# Altium PCB A313_6.PcbDoc (part 1 of 3)
Units mm, origin at the board's own origin, x right, y up, seen from the top; angles counter-clockwise.
Board outline 230.01 x 157.01 mm, 2 copper layers (Top Layer, Bottom Layer); 234 components, 195 nets, 1068 pads, 566 vias.
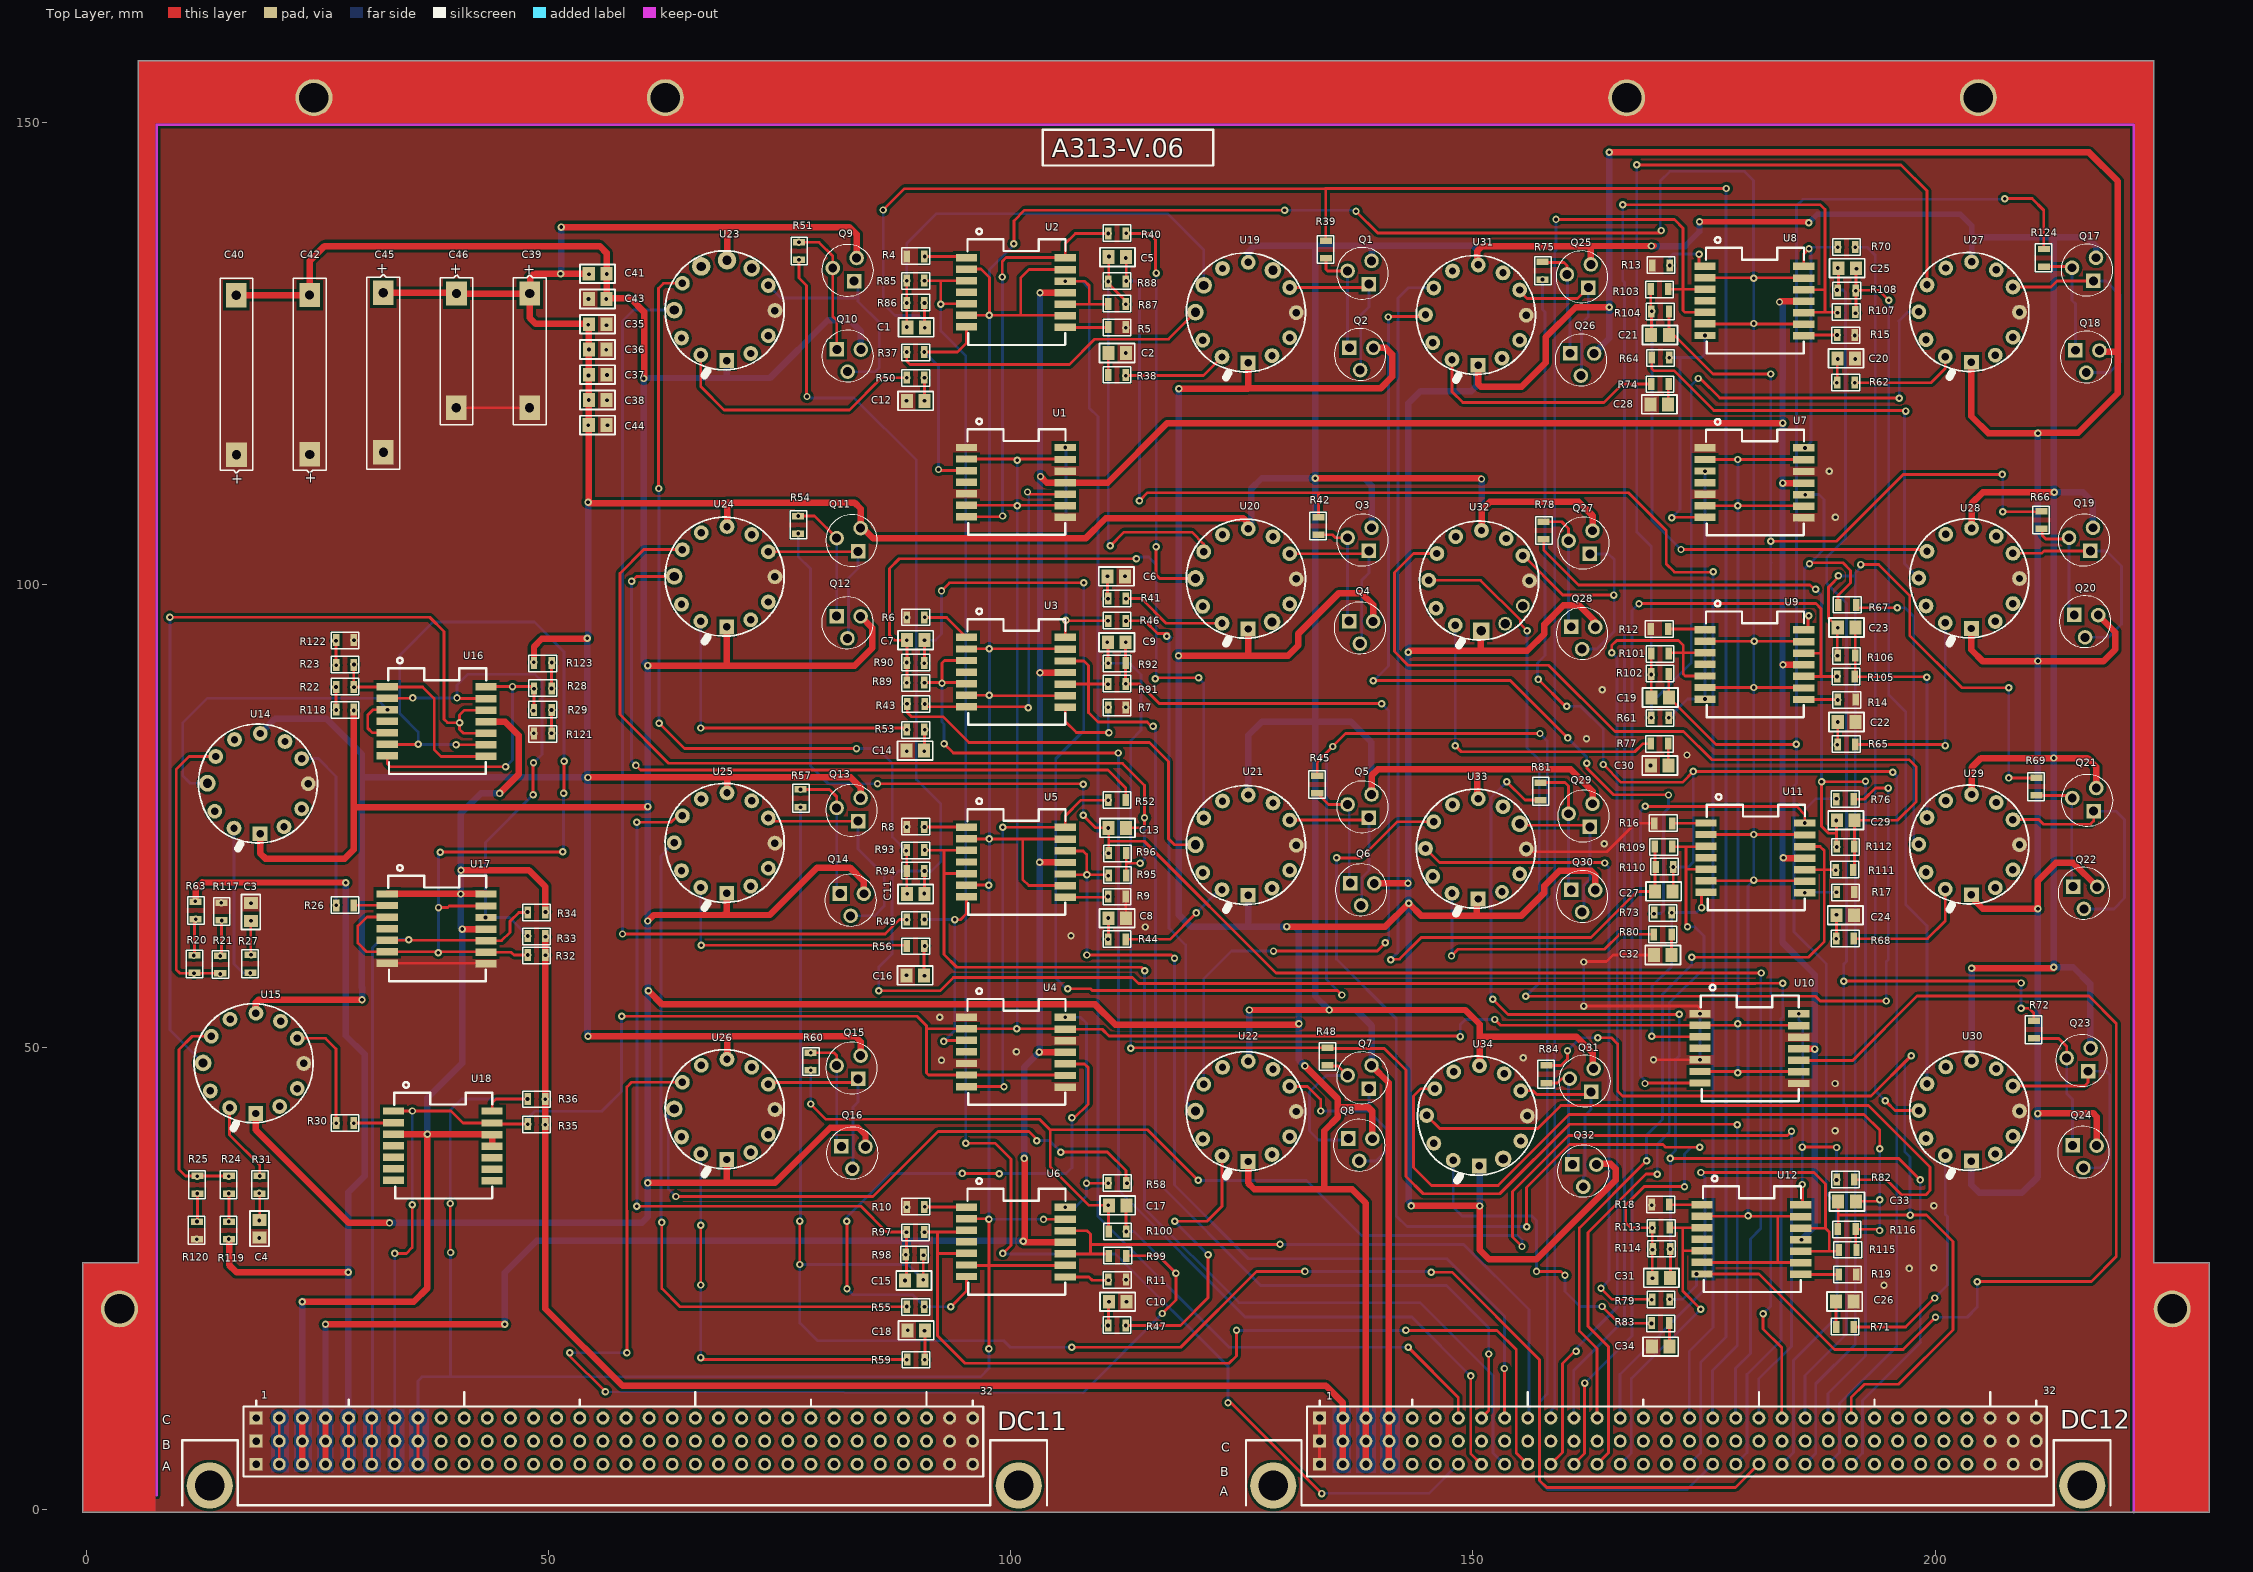
[diagram p0: Top Layer view]
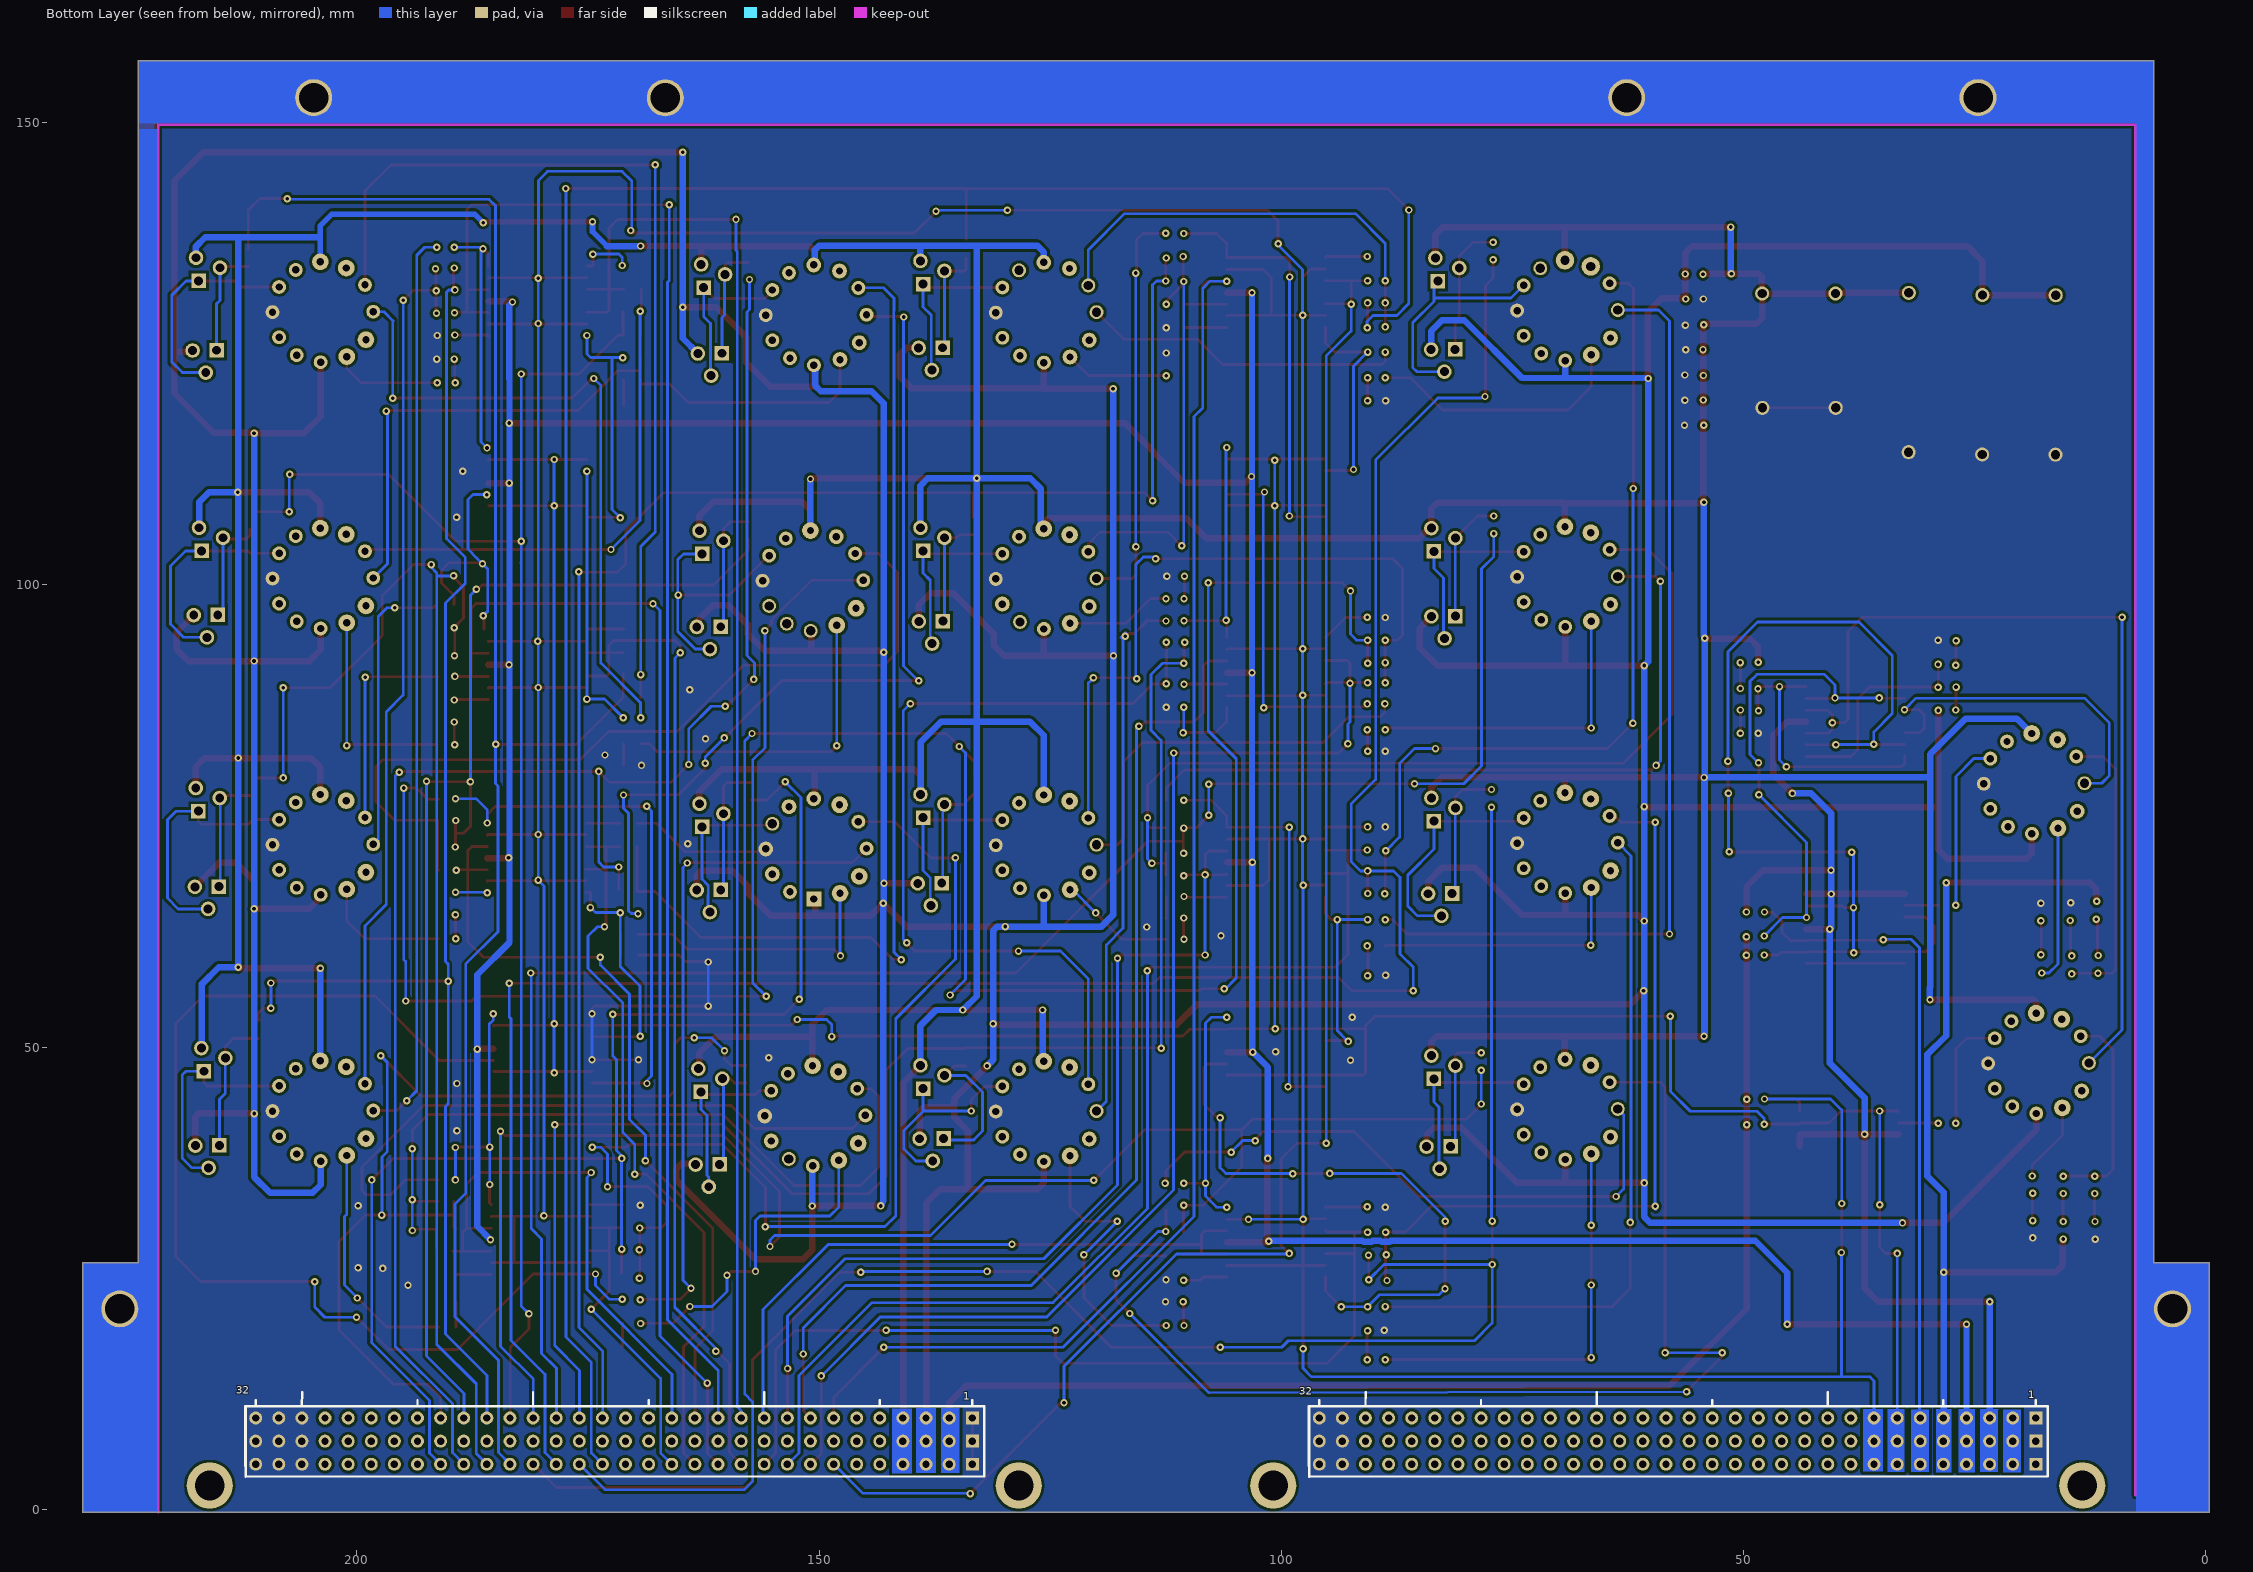
[diagram p1: Bottom Layer view, seen from below]

## Layer stack, top to bottom
Top Solder: solder mask 0.0102, Solder Resist, Dk 3.5
Top Layer: signal copper 0.0356
Dielectric1: dielectric 0.32, FR-4, Dk 4.8
Bottom Layer: signal copper 0.0356
Bottom Solder: solder mask 0.0102, Solder Resist, Dk 3.5

## Board outline
-0.37,-0.304 -0.37,26.696 cw(c-0.363,26.696) -0.363,26.703 5.63,26.703 5.63,156.696 cw(c5.637,156.696) 5.637,156.703 223.637,156.703 cw(c223.637,156.696) 223.644,156.696 223.644,26.703 229.637,26.703 cw(c229.637,26.696) 229.644,26.696 229.644,-0.304 cw(c229.637,-0.304) 229.637,-0.311 -0.363,-0.311 cw(c-0.363,-0.304)

## Design rules (kind name [scope] priority, off if disabled: settings)
Clearance [All] p1: gap=0.3 ignorepadtopadclearanceinfootprint=FALSE except(0: Arc-Hole Track-Hole SMDPad-Hole THPad-Hole Via-Hole Fill-Hole Poly-Hole Region-Hole Text-Hole)
HoleSize [All] p1: absolutevalues=TRUE maxlimit=10 minlimit=0.025 maxpercent=80.000 minpercent=20.000
MinimumSolderMaskSliver [All] p1: minsoldermaskwidth=0.1
PolygonConnect [All] p1: connectstyle=Direct reliefconductorwidth=0.254 reliefentries=4 polygonreliefangle="90 Angle" airgapwidth=0.254
RoutingVias [All] p1: holewidth=0.4 width=0.8 viastyle="Through Hole" minholewidth=0.4 minwidth=0.8 maxholewidth=0.4 maxwidth=0.8
SilkToSilkClearance [All] p1: silktosilkclearance=0.2
SilkToSolderMaskClearance [IsPad] p1: minsilkscreentomaskgap=0 clearancetoexposedcopper=TRUE
SolderMaskExpansion [All] p1: expansion=0.102
Width [All] p1: maxlimit=1 minlimit=0.3 preferedwidth=0.3 minimp=50.000000 maximp=50.000000 favimp=50.000000
26 further rules are at their usual default settings.

## Components (designator, comment, footprint, x,y, rotation, side; value= is the part's Value field where it differs from the comment)
C1 "CAP NP" 0805 89.775,127.85 r0 top
C2 "CAP NP" 0805 111.525,125.075 r180 top
C3 "CAP NP" 0805 17.825,64.625 r90 top
C4 "CAP NP" 0805 18.768,30.374 r270 top
C5 "CAP NP" 0805 111.55,135.45 r0 top
C6 "CAP NP" 0805 111.425,100.925 r180 top
C7 "CAP NP" 0805 89.725,94.025 r0 top
C8 "CAP NP" 0805 111.525,63.95 r180 top
C9 "CAP NP" 0805 111.475,93.8 r180 top
C10 "CAP NP" 0805 111.575,22.475 r180 top
C11 "CAP NP" 0805 89.725,66.575 r0 top
C12 "CAP NP" 0805 89.725,119.9 r0 top
C13 "CAP NP" 0805 111.55,73.725 r180 top
C14 "CAP NP" 0805 89.675,82.075 r0 top
C15 "CAP NP" 0805 89.525,24.775 r0 top
C16 "CAP NP" 0805 89.675,57.775 r0 top
C17 "CAP NP" 0805 111.575,32.9 r180 top
C18 "CAP NP" 0805 89.775,19.375 r0 top
C19 "CAP NP" 0805 170.25,87.825 r0 top
C20 "CAP NP" 0805 190.35,124.5 r180 top
C21 "CAP NP" 0805 170.225,127.025 r0 top
C22 "CAP NP" 0805 190.4,85.175 r180 top
C23 "CAP NP" 0805 190.4,95.4 r180 top
C24 "CAP NP" 0805 190.275,64.275 r180 top
C25 "CAP NP" 0805 190.475,134.25 r180 top
C26 "CAP NP" 0805 190.2,22.5 r180 top
C27 "CAP NP" 0805 170.625,66.85 r0 top
C28 "CAP NP" 0805 170.15,119.525 r0 top
C29 "CAP NP" 0805 190.325,74.55 r180 top
C30 "CAP NP" 0805 170.2,80.475 r0 top
C31 "CAP NP" 0805 170.375,25.05 r0 top
C32 "CAP NP" 0805 170.525,59.975 r0 top
C33 "CAP NP" 0805 190.45,33.3 r180 top
C34 "CAP NP" 0805 170.3,17.625 r0 top
C35 "3300pf" 0805 55.327,128.192 r180 top
C36 "3300pf" 0805 55.327,125.462 r180 top
C37 "3300pf" 0805 55.327,122.733 r180 top
C38 "3300pf" 0805 55.327,120.004 r180 top
C39 "4,7uf" c4,7uf 47.975,133.525 r270 top
C40 "22uf" c22uf 16.3,112 r90 top
C41 "3300pf" 0805 55.322,133.65 r0 top
C42 "22uf" c22uf 24.232,112.025 r90 top
C43 "3300pf" 0805 55.327,130.921 r180 top
C44 "3300pf" 0805 55.322,117.275 r0 top
C45 "22uf" c22uf 32.11,133.675 r270 top
C46 "4,7uf" c4,7uf 40.043,133.525 r270 top
DC11 "DC96c" DC96 3.526,3.671 r0 top locked
DC12 "DC96c" DC96 118.551,3.671 r0 top locked
Q1 "2T312B" TZT203G 137.8,133.95 r0 top
Q2 "2T203B" 2T203B 137.7,124.8 r180 top
Q3 "2T312B" TZT203G 137.8,105.1 r0 top
Q4 "2T203B" 2T203B 137.675,95.225 r180 top
Q5 "2T312B" TZT203G 137.8,76.25 r0 top
Q6 "2T203B" 2T203B 137.8,66.9 r180 top
Q7 "2T312B" TZT203G 137.8,46.95 r0 top
Q8 "2T203B" 2T203B 137.6,39.275 r180 top
Q9 "2T312B" TZT203G 82.119,134.271 r0 top
Q10 "2T203B" 2T203B 82.275,124.625 r180 top
Q11 "2T312B" TZT203G 82.55,105.05 r0 top
Q12 "2T203B" 2T203B 82.25,95.775 r180 top
Q13 "2T312B" TZT203G 82.55,75.875 r0 top
Q14 "2T203B" 2T203B 82.6,65.775 r180 top
Q15 "2T312B" TZT203G 82.55,48 r0 top
Q16 "2T203B" 2T203B 82.775,38.425 r180 top
Q17 "2T312B" TZT203G 216.15,134.3 r0 top
Q18 "2T203B" 2T203B 216.225,124.525 r180 top
Q19 "2T312B" TZT203G 215.825,105.1 r0 top
Q20 "2T203B" 2T203B 216.1,95.9 r180 top
Q21 "2T312B" TZT203G 216.175,76.95 r0 top
Q22 "2T203B" 2T203B 215.975,66.525 r180 top
Q23 "2T312B" TZT203G 215.575,48.825 r0 top
Q24 "2T203B" 2T203B 215.925,38.525 r180 top
Q25 "2T312B" TZT203G 161.525,133.575 r0 top
Q26 "2T203B" 2T203B 161.575,124.2 r180 top
Q27 "2T312B" TZT203G 161.7,104.775 r0 top
Q28 "2T203B" 2T203B 161.7,94.625 r180 top
Q29 "2T312B" TZT203G 161.7,75.25 r0 top
Q30 "2T203B" 2T203B 161.7,66.175 r180 top
Q31 "2T312B" TZT203G 161.825,46.6 r0 top
Q32 "2T203B" 2T203B 161.825,36.475 r180 top
R4 "10k/1%" R0805 90.398,135.425 r90 top
R5 "10k/1%" R0805 110.827,127.975 r270 top
R6 "10k/1%" R0805 90.398,96.375 r90 top
R7 "10k/1%" R0805 110.827,86.85 r270 top
R8 "10k/1%" R0805 90.398,73.725 r90 top
R9 "10k/1%" R0805 110.827,66.4 r270 top
R10 "10k/1%" R0805 90.398,32.625 r90 top
R11 "10k/1%" R0805 110.85,24.95 r270 top
R12 "10k/1%" R0805 170.825,95.125 r90 top
R13 "10k/1%" R0805 171,134.45 r90 top
R14 "10k/1%" R0805 189.75,87.675 r270 top
R15 "10k/1%" R0805 189.65,127.125 r270 top
R16 "10k/1%" R0805 171.25,74.125 r90 top
R17 "10k/1%" R0805 189.6,66.875 r270 top
R18 "10k/1%" R0805 170.975,32.875 r90 top
R19 "10k/1%" R0805 189.825,25.525 r270 top
R20 "2,61k/1%" R0805 11.625,58.325 r0 top
R21 "301r/1%" R0805 14.425,58.275 r0 top
R22 "10,5k/1%" R0805 28.673,88.875 r90 top
R23 "301r/1%" R0805 28.673,91.25 r90 top
R24 "2,050Mom/1%" R0805 15.545,35.799 r180 top
R25 "301r/1%" R0805 12.143,35.799 r180 top
R26 "4,7k" R0805 28.673,65.25 r90 top
R27 "56r" R0805 17.875,59.7 r180 top
R28 "10,5k/1%" R0805 50.073,88.725 r90 top
R29 "301r/1%" R0805 50.073,86.4 r90 top
R30 "4,7k" R0805 28.673,41.7 r90 top
R31 "56r" R0805 18.693,34.451 r0 top
R32 "10k" R0805 48.05,60.05 r270 top
R33 "10k" R0805 48.05,62.125 r270 top
R34 "1,8k" R0805 48.05,64.675 r270 top
R35 "10k" R0805 48.05,41.775 r270 top
R36 "10k" R0805 48.05,44.5 r270 top
R37 "4,7k/5%" R0805 89.05,125.275 r270 top
R38 "56r" R0805 112.175,122.6 r90 top
R39 "180r" R0805 134.2,136.95 r180 top
R40 "4,7k/5%" R0805 112.175,137.925 r90 top
R41 "56r" R0805 112.175,98.425 r90 top
R42 "180r" R0805 133.375,107.05 r180 top
R43 "4,7k/5%" R0805 89.1,87.225 r270 top
R44 "56r" R0805 112.175,61.575 r90 top
R45 "180r" R0805 133.25,79.1 r180 top
R46 "4,7k/5%" R0805 112.175,96.025 r90 top
R47 "56r" R0805 112.175,19.825 r90 top
R48 "180r" R0805 134.375,49.675 r180 top
R49 "4,7k/5%" R0805 89.05,63.9 r270 top
R50 "56r" R0805 89.05,122.5 r270 top
R51 "180r" R0805 77.007,135.426 r0 top
R52 "4,7k/5%" R0805 112.175,76.625 r90 top
R53 "56r" R0805 89.05,84.45 r270 top
R54 "180r" R0805 76.925,105.825 r0 top
R55 "4,7k/5%" R0805 89.05,22.025 r270 top
R56 "56r" R0805 89.05,61.05 r270 top
R57 "180r" R0805 77.175,76.25 r0 top
R58 "4,7k/5%" R0805 112.2,35.2 r90 top
R59 "56r" R0805 89.075,16.325 r270 top
R60 "180r" R0805 78.275,47.775 r0 top
R61 "4,7k/5%" R0805 169.55,85.725 r270 top
R62 "56r" R0805 191,121.775 r90 top
R63 "0r" R0805 11.75,64.125 r0 top
R64 "4,7k/5%" R0805 169.6,124.675 r270 top
R65 "56r" R0805 191.05,82.65 r90 top
R66 "180r" R0805 211.575,107.7 r180 top
R67 "4,7k/5%" R0805 191.15,97.725 r90 top
R68 "56r" R0805 190.925,61.65 r90 top
R69 "180r" R0805 211.025,78.85 r180 top
R70 "4,7k/5%" R0805 191.075,136.425 r90 top
R71 "56r" R0805 190.9,19.65 r90 top
R72 "180r" R0805 210.75,52.575 r180 top
R73 "4,7k/5%" R0805 169.875,64.65 r270 top
R74 "56r" R0805 169.55,121.825 r270 top
R75 "180r" R0805 157.425,133.3 r0 top
R76 "4,7k/5%" R0805 190.925,76.725 r90 top
R77 "56r" R0805 169.5,82.925 r270 top
R78 "180r" R0805 157.55,105.2 r0 top
R79 "4,7k/5%" R0805 169.65,22.825 r270 top
R80 "56r" R0805 169.85,62.3 r270 top
R81 "180r" R0805 157.2,77 r0 top
R82 "4,7k/5%" R0805 190.95,35.575 r90 top
R83 "56r" R0805 169.625,20.25 r270 top
R84 "180r" R0805 158.025,47.75 r180 top
R85 "10k" R0805 89.05,133 r270 top
R86 "10k" R0805 90.398,130.4 r90 top
R87 "10k" R0805 112.175,130.3 r90 top
R88 "10k/1%" R0805 112.175,132.725 r90 top
R89 "10k" R0805 89.05,89.525 r270 top
R90 "10k" R0805 90.398,91.475 r90 top
R91 "10k" R0805 112.175,89.2 r90 top
R92 "10k" R0805 110.827,91.625 r270 top
R93 "10k" R0805 89.05,71.4 r270 top
R94 "10k" R0805 90.398,68.975 r90 top
R95 "10k" R0805 112.225,68.5 r90 top
R96 "10k" R0805 110.875,71.1 r270 top
R97 "10k" R0805 89.025,30.1 r270 top
R98 "10k" R0805 90.275,27.475 r90 top
R99 "10k" R0805 112.25,27.35 r90 top
R100 "10k" R0805 110.875,30.175 r270 top
R101 "10k" R0805 169.55,92.65 r270 top
R102 "10k" R0805 170.9,90.275 r90 top
R103 "10k" R0805 169.5,132.075 r270 top
R104 "10k" R0805 170.925,129.45 r90 top
R105 "10k" R0805 191.025,89.975 r90 top
R106 "10k" R0805 189.725,92.45 r270 top
R107 "1OK" R0805 191.05,129.4 r90 top
R108 "10k" R0805 189.75,131.95 r270 top
R109 "10k" R0805 169.95,71.775 r270 top
R110 "10k" R0805 171.375,69.4 r90 top
R111 "10k" R0805 190.875,69.075 r90 top
R112 "1OK" R0805 189.625,71.8 r270 top
R113 "10k" R0805 169.675,30.575 r270 top
R114 "10k" R0805 171.075,28.075 r90 top
R115 "10k" R0805 191.201,27.968 r90 top
R116 "10k" R0805 189.75,30.425 r270 top
R117 "0r" R0805 14.55,64 r0 top
R118 "0r" R0805 27.325,86.6 r270 top
R119 "0r" R0805 15.545,30.874 r180 top
R120 "0r" R0805 12.093,30.874 r180 top
R121 "0r" R0805 48.725,84.025 r270 top
R122 "0r" R0805 27.325,94.125 r270 top
R123 "0r" R0805 48.725,91.65 r270 top
R124 "180r" R0805 211.825,136.05 r180 top (schematic designator Rr63)
U1 "168KT2b_4" 168KT2B-1#1 95.325,116.685 r0 top
U2 "168KT2b_4" 168KT2B-1#1 95.325,137.225 r0 top
U3 "168KT2b_4" 168KT2B-1#1 95.325,96.145 r0 top
U4 "168KT2b_4" 168KT2B-1#1 95.325,55.065 r0 top
U5 "168KT2b_4" 168KT2B-1#1 95.325,75.605 r0 top
U6 "168KT2b_4" 168KT2B-1#1 95.325,34.525 r0 top
U7 "168KT2b_4" 168KT2B-1#1 175.199,116.638 r0 top
U8 "168KT2b_4" 168KT2B-1#1 175.199,136.3 r0 top
U9 "168KT2b_4" 168KT2B-1#1 175.199,96.976 r0 top
U10 "168KT2b_4" 168KT2B-1#1 174.65,55.45 r0 top
U11 "168KT2b_4" 168KT2B-1#1 175.3,76.075 r0 top
U12 "168KT2b_4" 168KT2B-1#2 174.875,34.8 r0 top
U14 "140YD1B" 140YD#1 18.825,78.775 r0 top
U15 "140YD1B" 140YD#1 18.35,48.525 r0 top
U16 "168KT2V" 168KT2B-1#1 32.675,90.825 r0 top
U17 "168KT2V" 168KT2B-1#1 32.675,68.4 r0 top
U18 "168KT2V" 168KT2B-1#1 33.35,44.925 r0 top
U19 "140YD1B" 140YD#2 125.675,129.725 r0 top
U20 "140YD1B" 140YD#3 125.675,100.925 r0 top
U21 "140YD1B" 140YD#1 125.675,72.125 r0 top
U22 "140YD1B" 140YD#4 125.675,43.325 r0 top
U23 "140YD1B" 140YD#5 69.3,129.95 r0 top
U24 "140YD1B" 140YD#1 69.3,101.15 r0 top
U25 "140YD1B" 140YD#6 69.3,72.35 r0 top
U26 "140YD1B" 140YD#7 69.3,43.55 r0 top
U27 "140YD1B" 140YD#6 203.9,129.775 r0 top
U28 "140YD1B" 140YD#6 203.9,100.975 r0 top
U29 "140YD1B" 140YD#8 203.9,72.175 r0 top
U30 "140YD1B" 140YD#6 203.9,43.375 r0 top
U31 "140YD1B" 140YD#9 150.55,129.45 r0 top
U32 "140YD1B" 140YD#10 150.9,100.725 r0 top
U33 "140YD1B" 140YD#11 150.55,71.725 r0 top
U34 "140YD1B" 140YD#12 150.675,42.85 r0 top

## Footprints (in the part's own frame and the unit in brackets; to place one, negate y for a bottom-side part, rotate by r counter-clockwise, add the part's x,y. Pads: shape width x height; smd on the part's side, far side on the other; paste and mask are expansions set on the pad)
2T203B [mil]
  rect 62x62 hole 38 mask+5: 1(42.32,-33.46)
  round 62 hole 38 mask+7.87: 2(-3.85,61.72)
  round 62 hole 38 mask+5: 3(-60.04,-32.48)
  silkscreen extent -114,-115 106,105
140YD#1 [mm]
  rect 1.6x1.6 / inner rect 1.6x1.6 / far side round 1.499 hole 0.8 mask+0.2: 1(0,-5.69)
  round 1.6 / inner round 1.6 / far side round 1.499 hole 0.8: 2(2.59,-4.928) 3(4.495,-2.997) 4(5.207,-0.279) 5(4.495,2.438) 6(2.692,4.293) 9(-4.801,2.667)
  round 1.6 / inner round 1.6 / far side round 1.8 hole 0.8 mask+0.2: 7(0.025,5.156)
  round 1.6 / inner round 1.6 / far side round 1.8 hole 0.8: 8(-2.769,4.496) 12(-2.82,-5.08)
  round 1.8 / inner round 1.8 / far side round 1.499 hole 1: 10(-5.69,-0.229)
  round 1.6 hole 0.8: 11(-4.903,-3.251)
  silkscreen extent -6.66,-7.29 6.21,6.18
140YD#2 [mm]
  rect 1.6x1.6 / inner rect 1.6x1.6 / far side round 1.499 hole 0.8 mask+0.2: 1(0,-5.69)
  round 1.6 / inner round 1.6 / far side round 1.499 hole 0.8: 2(2.59,-4.928) 3(4.495,-2.997) 4(5.207,-0.279) 5(4.495,2.438)
  round 1.8 / inner round 1.8 / far side round 1.499 hole 1: 6(2.692,4.293) 9(-4.801,2.667) 10(-5.69,-0.229)
  round 1.6 hole 0.8 mask+0.2: 7(0.025,5.156)
  round 1.6 hole 0.8: 8(-2.769,4.496) 11(-4.903,-3.251) 12(-2.82,-5.08)
  silkscreen extent -6.66,-7.29 6.21,6.18
140YD#3 [mm]
  rect 1.6x1.6 / inner rect 1.6x1.6 / far side round 1.499 hole 0.8 mask+0.2: 1(0,-5.69)
  round 1.8 / inner round 1.8 / far side round 1.499 hole 1: 2(2.59,-4.928) 10(-5.69,-0.229)
  round 1.6 hole 0.8: 3(4.495,-2.997) 11(-4.903,-3.251)
  round 1.6 / inner round 1.6 / far side round 1.499 hole 0.8: 4(5.207,-0.279) 5(4.495,2.438) 6(2.692,4.293) 9(-4.801,2.667)
  round 1.6 / inner round 1.6 / far side round 1.8 hole 0.8 mask+0.2: 7(0.025,5.156)
  round 1.6 / inner round 1.6 / far side round 1.8 hole 0.8: 8(-2.769,4.496) 12(-2.82,-5.08)
  silkscreen extent -6.66,-7.29 6.21,6.18
140YD#4 [mm]
  rect 1.6x1.6 / inner rect 1.6x1.6 / far side round 1.499 hole 0.8 mask+0.15: 1(0,-5.69)
  round 1.6 / inner round 1.6 / far side round 1.499 hole 0.8: 2(2.59,-4.928) 3(4.495,-2.997) 4(5.207,-0.279) 5(4.495,2.438) 6(2.692,4.293) 9(-4.801,2.667)
  round 1.6 / inner round 1.6 / far side round 1.8 hole 0.8 mask+0.2: 7(0.025,5.156)
  round 1.6 / inner round 1.6 / far side round 1.8 hole 0.8: 8(-2.769,4.496) 12(-2.82,-5.08)
  round 1.8 / inner round 1.8 / far side round 1.499 hole 1: 10(-5.69,-0.229)
  round 1.6 hole 0.8: 11(-4.903,-3.251)
  silkscreen extent -6.66,-7.29 6.21,6.18
140YD#5 [mm]
  rect 1.6x1.6 / inner rect 1.6x1.6 / far side round 1.499 hole 0.8 mask+0.2: 1(0,-5.69)
  round 1.6 / inner round 1.6 / far side round 1.499 hole 0.8: 2(2.59,-4.928) 3(4.495,-2.997) 4(5.207,-0.279) 5(4.495,2.438) 9(-4.801,2.667)
  round 1.8 / inner round 1.8 / far side round 1.499 hole 1: 6(2.692,4.293) 10(-5.69,-0.229)
  round 2 hole 1 mask+0.2: 7(0.025,5.156)
  round 2 hole 1: 8(-2.769,4.496)
  round 1.6 hole 0.8: 11(-4.903,-3.251)
  round 1.6 / inner round 1.6 / far side round 1.8 hole 0.8: 12(-2.82,-5.08)
  silkscreen extent -6.66,-7.29 6.21,6.18
140YD#6 [mm]
  rect 1.6x1.6 / inner rect 1.6x1.6 / far side round 1.499 hole 0.8 mask+0.2: 1(0,-5.69)
  round 1.6 / inner round 1.6 / far side round 1.499 hole 0.8: 2(2.59,-4.928) 3(4.495,-2.997) 4(5.207,-0.279) 5(4.495,2.438) 6(2.692,4.293) 9(-4.801,2.667) 10(-5.69,-0.229)
  round 1.6 / inner round 1.6 / far side round 1.8 hole 0.8 mask+0.2: 7(0.025,5.156)
  round 1.6 / inner round 1.6 / far side round 1.8 hole 0.8: 8(-2.769,4.496) 11(-4.903,-3.251) 12(-2.82,-5.08)
  silkscreen extent -6.66,-7.29 6.21,6.18
140YD#7 [mm]
  rect 1.6x1.6 / inner rect 1.6x1.6 / far side round 1.499 hole 0.8 mask+0.2: 1(0,-5.69)
  round 1.6 / inner round 1.6 / far side round 1.499 hole 0.8: 2(2.59,-4.928) 3(4.495,-2.997) 4(5.207,-0.279) 5(4.495,2.438) 6(2.692,4.293) 9(-4.801,2.667)
  round 1.6 hole 0.8 mask+0.2: 7(0.025,5.156)
  round 1.6 / inner round 1.6 / far side round 1.8 hole 0.8: 8(-2.769,4.496) 12(-2.82,-5.08)
  round 1.8 / inner round 1.8 / far side round 1.499 hole 1: 10(-5.69,-0.229)
  round 1.6 hole 0.8: 11(-4.903,-3.251)
  silkscreen extent -6.66,-7.29 6.21,6.18
140YD#8 [mm]
  rect 1.6x1.6 / inner rect 1.6x1.6 / far side round 1.499 hole 0.8 mask+0.2: 1(0,-5.69)
  round 1.6 / inner round 1.6 / far side round 1.499 hole 0.8: 2(2.59,-4.928) 3(4.495,-2.997) 4(5.207,-0.279) 5(4.495,2.438) 6(2.692,4.293) 9(-4.801,2.667) 10(-5.69,-0.229)
  round 1.6 / inner round 1.6 / far side round 1.8 hole 0.8 mask+0.2: 7(0.025,5.156) 12(-2.82,-5.08)
  round 1.6 / inner round 1.6 / far side round 1.8 hole 0.8: 8(-2.769,4.496) 11(-4.903,-3.251)
  silkscreen extent -6.66,-7.29 6.21,6.18
140YD#9 [mm]
  rect 1.6x1.6 / inner rect 1.6x1.6 / far side round 1.499 hole 0.8 mask+0.2: 1(0,-5.69)
  round 1.6 / inner round 1.6 / far side round 1.499 hole 0.8: 2(2.59,-4.928) 3(4.495,-2.997) 4(5.207,-0.279) 5(4.495,2.438) 9(-4.801,2.667) 10(-5.69,-0.229)
  round 1.6 / inner round 1.6 / far side round 1.499 hole 0.8 mask+0.2: 6(2.692,4.293)
  round 1.6 hole 0.8 mask+0.2: 7(0.025,5.156)
  round 1.6 hole 0.8: 8(-2.769,4.496) 11(-4.903,-3.251) 12(-2.82,-5.08)
  silkscreen extent -6.66,-7.29 6.21,6.18
140YD#10 [mm]
  rect 1.8x1.8 / inner rect 1.8x1.8 / far side round 1.499 hole 1 mask+0.2: 1(0,-5.69)
  round 1.5 hole 1: 2(2.59,-4.928) 3(4.495,-2.997)
  round 1.6 / inner round 1.6 / far side round 1.499 hole 0.8: 4(5.207,-0.279) 5(4.495,2.438) 6(2.692,4.293) 9(-4.801,2.667) 10(-5.69,-0.229)
  round 1.6 / inner round 1.6 / far side round 1.8 hole 0.8 mask+0.2: 7(0.025,5.156)
  round 1.6 hole 0.8: 8(-2.769,4.496)
  round 1.6 / inner round 1.6 / far side round 1.8 hole 0.8: 11(-4.903,-3.251) 12(-2.82,-5.08)
  silkscreen extent -6.66,-7.29 6.21,6.18
140YD#11 [mm]
  rect 1.6x1.6 hole 0.8 mask+0.2: 1(0,-5.69)
  round 1.5 hole 0.8: 2(2.59,-4.928)
  round 1.6 hole 0.8: 3(4.495,-2.997) 4(5.207,-0.279) 6(2.692,4.293)
  round 1.8 / inner round 1.8 / far side round 1.499 hole 1: 5(4.495,2.438)
  round 1.6 hole 0.8 mask+0.2: 7(0.025,5.156)
  round 1.6 / inner round 1.6 / far side round 1.8 hole 0.8: 8(-2.769,4.496) 11(-4.903,-3.251) 12(-2.82,-5.08)
  round 1.6 / inner round 1.6 / far side round 1.499 hole 0.8: 9(-4.801,2.667) 10(-5.69,-0.229)
  silkscreen extent -6.66,-7.29 6.21,6.18
140YD#12 [mm]
  rect 1.6x1.6 / inner rect 1.6x1.6 / far side round 1.499 hole 0.8 mask+0.2: 1(0,-5.69)
  round 1.8 / inner round 1.8 / far side round 1.499 hole 1: 2(2.59,-4.928)
  round 1.6 hole 0.8: 3(4.495,-2.997) 4(5.207,-0.279)
  round 1.6 / inner round 1.6 / far side round 1.499 hole 0.8: 5(4.495,2.438) 6(2.692,4.293) 9(-4.801,2.667) 10(-5.69,-0.229)
  round 1.6 / inner round 1.6 / far side round 1.8 hole 0.8 mask+0.2: 7(0.025,5.156)
  round 1.6 / inner round 1.6 / far side round 1.8 hole 0.8: 8(-2.769,4.496) 11(-4.903,-3.251) 12(-2.82,-5.08)
  silkscreen extent -6.66,-7.29 6.21,6.18
168KT2B-1#1 [mm]
  rect 2.286x0.8 smd: 1(-0.1,-1.824) 2(-0.1,-3.074) 3(-0.1,-4.324) 4(-0.1,-5.574) 5(-0.1,-6.824) 6(-0.1,-8.074) 7(-0.1,-9.324) 8(10.575,-9.374) 9(10.575,-8.124) 10(10.575,-6.874) 11(10.575,-5.624) 12(10.575,-4.374) 13(10.575,-3.124) 14(10.575,-1.824)
  silkscreen extent 0,-11.28 10.6,1.3
168KT2B-1#2 [mm]
  rect 2.286x0.8 smd: 1(-0.1,-1.824) 2(-0.1,-3.074) 3(-0.1,-4.324) 4(-0.1,-5.574) 5(-0.1,-6.824) 6(-0.1,-8.074) 7(-0.1,-9.324) 8(10.575,-9.374) 9(10.575,-8.124) 10(10.575,-6.874) 12(10.575,-4.374) 13(10.575,-3.124) 14(10.575,-1.824)
  rect 2.286x0.8 smd mask+0.2: 11(10.575,-5.624)
  silkscreen extent 0,-11.28 10.6,1.3
0805 [mm] "Chip Capacitor; Body 2.0 x 1.2 mm (LxW typ)"
  rect 1.3x1.5 smd: 1(-0.95,0) 2(0.95,0)
  silkscreen extent -1.9,-1.02 1.91,1.02
c4,7uf [mil]
  rect 104x88 smd: 1(79.21,1.06) 2(565.94,0)
  silkscreen extent 0,-69 638,71
c22uf [mil]
  rect 104x88 smd: 1(82.17,1.06) 2(760.83,1.97)
  silkscreen extent 3,-69 833,71
DC96 [mm]
  round 5 hole 3.2: A(9.849,-1.071) B(97.349,-1.071)
  rect 1.4x1.4 hole 0.8: A1(14.874,1.229) B1(14.874,3.729) C1(14.874,6.229)
  round 1.4 hole 0.8: A2(17.374,1.229) A3(19.874,1.229) A4(22.374,1.229) A5(24.874,1.229) A6(27.374,1.229) A7(29.874,1.229) A8(32.374,1.229) A9(34.874,1.229) A10(37.374,1.229) A11(39.874,1.229) A12(42.374,1.229) A13(44.874,1.229) A14(47.374,1.229) A15(49.874,1.229) A16(52.374,1.229) A17(54.874,1.229) A18(57.374,1.229) A19(59.874,1.229) A20(62.374,1.229) A21(64.874,1.229) A22(67.374,1.229) A23(69.874,1.229) A24(72.374,1.229) A25(74.874,1.229) A26(77.374,1.229) A27(79.874,1.229) A28(82.374,1.229) A29(84.874,1.229) A30(87.374,1.229) A31(89.874,1.229) A32(92.374,1.229) B2(17.374,3.729) B3(19.874,3.729) B4(22.374,3.729) B5(24.874,3.729) B6(27.374,3.729) B7(29.874,3.729) B8(32.374,3.729) B9(34.874,3.729) B10(37.374,3.729) B11(39.874,3.729) B12(42.374,3.729) B13(44.874,3.729) B14(47.374,3.729) B15(49.874,3.729) B16(52.374,3.729) B17(54.874,3.729) B18(57.374,3.729) B19(59.874,3.729) B20(62.374,3.729) B21(64.874,3.729) B22(67.374,3.729) B23(69.874,3.729) B24(72.374,3.729) B25(74.874,3.729) B26(77.374,3.729) B27(79.874,3.729) B28(82.374,3.729) B29(84.874,3.729) B30(87.374,3.729) B31(89.874,3.729) B32(92.374,3.729) C2(17.374,6.229) C3(19.874,6.229) C4(22.374,6.229) C5(24.874,6.229) C6(27.374,6.229) C7(29.874,6.229) C8(32.374,6.229) C9(34.874,6.229) C10(37.374,6.229) C11(39.874,6.229) C12(42.374,6.229) C13(44.874,6.229) C14(47.374,6.229) C15(49.874,6.229) C16(52.374,6.229) C17(54.874,6.229) C18(57.374,6.229) C19(59.874,6.229) C20(62.374,6.229) C21(64.874,6.229) C22(67.374,6.229) C23(69.874,6.229) C24(72.374,6.229) C25(74.874,6.229) C26(77.374,6.229) C27(79.874,6.229) C28(82.374,6.229) C29(84.874,6.229) C30(87.374,6.229) C31(89.874,6.229) C32(92.374,6.229)
  silkscreen extent 6.9,-3.2 100.4,9
R0805 [mm]
  rect 1.3x0.7 smd: 1(0.093,1.624) 2(0.093,-0.276)
  silkscreen extent -0.76,-0.83 1.02,2.17
TZT203G [mil]
  rect 62x62 hole 38 mask+5: 1(37.4,-56.1)
  round 62 hole 38 mask+7.87: 2(48.33,42.67)
  round 62 hole 38 mask+5: 3(-53.69,0.09)
  silkscreen extent -100,-120 120,100

## Part data
C35 C36 C37 C38 C41 C43 C44: library part "CAP NP"
C39 C40 C42 C45 C46: library part "CAP POL"
Q1 Q3 Q5 Q7 Q9 Q11 Q13 Q15 Q17 Q19 Q21 Q23 Q25 Q27 Q29: library part 2N1069
Q2 Q4 Q6 Q8 Q10 Q12 Q14 Q16 Q18 Q20 Q22 Q24 Q26 Q28 Q30: library part 2N1132A
Q31: library part 2N1069_0
Q32: library part 2N1132A_1
R4 R5 R6 R7 R8 R9 R10 R11 R12 R13 R14 R15 R16 R17 R18 R19 R20 R21 R22 R23 R24 R25 R26 R27 R28 R29 R30 R31 R32 R33 R34 R35 R36 R37 R38 R39 R40 R41 R42 R43 R44 R45 R46 R47 R48 R49 R50 R51 R52 R53 R54 R55 R56 R57 R58 R59 R60 R61 R62 R63 R64 R65 R66 R67 R68 R69 R70 R71 R72 R73 R74 R75 R76 R77 R78 R79 R80 R81 R82 R83 R84 R85 R86 R87 R88 R89 R90 R91 R92 R93 R94 R95 R96 R97 R98 R99 R100 R101 R102 R103 R104 R105 R106 R107 R108 R109 R110 R111 R112 R113 R114 R115 R116 R117 R118 R119 R120 R121 R122 R123 R124: library part R
U1: library part 168KT2b_23
U2: library part 168KT2b_24
U3 U4 U5 U6 U7 U8 U9 U10 U11: library part 168KT2b_2
U12: library part 168KT2b_22
U14 U15 U19 U20 U21 U22 U23 U24 U25 U26 U27 U28 U29 U30 U31 U32 U33 U34: library part 140YD1B_0
U16: library part 168KT2b_21
U17 U18: library part 168KT2b_19

## Free pads (board coordinates)
  round 4 hole 3.2: 0(3.625,21.7) 0(24.65,152.7) 0(62.65,152.7) 0(166.625,152.675) 0(204.65,152.7) 0(225.625,21.7)
  round 1.524 hole 1: 2(16.25,131.325) 3(16.273,114.087) 4(24.205,114.112) 5(24.182,131.35) 6(32.137,131.588) 7(32.16,114.35) 8(40.07,131.513) 9(40.043,119.15) 10(47.975,119.15) 11(48.002,131.513)

## Via types
v1: diameter 0.8, hole 0.4, Top Layer to Bottom Layer, 566 vias

## Nets (pads, with @x,y where several pads share a name; then routed paths per layer and width w, separated by ;. In a path a pad name is that pad's centre, name@x,y a point inside that pad or via, vN(x,y) a via of type N, cw(c..) or ccw(c..) an arc to the next point about the centre after c; other vN are vias at no path point)
+3,5V: DC11.A3 DC11.B3 DC11.C3 R34.1 U16.11 U17.1 U17.11 U17.14 U18.3 U18.11 U18.12 | length 139
  Top Layer w0.7: DC11.A3@23.4,4.9 DC11.B3@23.4,7.4 DC11.C3@23.4,9.9 ; v1(23.4,22.475) 35.45,22.475 36.925,23.95 v1(36.925,40.601) ; U17.1@32.575,66.576 v1(40.525,66.576) U17.14@43.25,66.576 ; U18.3@33.25,40.601 v1(36.925,40.601) ; v1(40.55,69.15) 47.898,69.15 49.674,67.374 R34.1@49.674,64.582 ; v1(40.674,62.776) U17.11@43.25,62.776 ; U16.11@43.25,85.201 45.324,85.201 46.775,83.75 46.775,79.5 v1(44.725,77.45) ; U18.11@43.925,39.301 U18.12@43.925,40.551 43.875,40.601 v1(36.925,40.601)
  Bottom Layer w0.7: DC11.C3@23.4,9.9 v1(23.4,22.475) v1@23.4,22.6 ; v1(36.925,40.601) 36.925,44.525 40.674,48.274 v1(40.674,62.776) 40.55,62.9 v1(40.55,69.15) 40.55,75.3 42.7,77.45 v1(44.725,77.45)
  other v1: 49.7,64.625
+5V: DC11.A2 DC11.B2 DC11.C2 | length 5
  Top Layer w0.3: DC11.A2@20.9,4.9 DC11.B2@20.9,7.4 DC11.C2@20.9,9.9
+6,3V: DC11.A4 DC11.B4 DC11.C4 U1.11 U2.11 U3.11 U4.11 U5.11 U6.11 U7.11 U8.11 U9.11 U10.11 U11.11 U12.11 | length 414.2
  Top Layer w0.7: DC11.A4@25.9,4.9 DC11.B4@25.9,7.4 DC11.C4@25.9,9.9 ; v1(25.9,20.025) v1(45.275,20.025) ; v1@101.275,29.075 101.525,29.325 v1@101.525,37.775 ; v1@101.449,28.901 U6.11@105.9,28.901 ; v1@103.096,90.521 U3.11@105.9,90.521 ; v1@103.134,49.441 U4.11@105.9,49.441 ; v1@103.144,69.981 U5.11@105.9,69.981 ; v1(103.174,131.601) U2.11@105.9,131.601 ; v1(103.225,111.725) 103.889,111.061 U1.11@105.9,111.061 110.486,111.061 116.925,117.5 v1(183.5,117.5) ; v1@183.226,130.676 U8.11@185.774,130.676 ; v1(183.489,111.014) U7.11@185.774,111.014 ; v1(183.523,91.352) U9.11@185.774,91.352 ; v1(183.575,70.475) 183.599,70.451 U11.11@185.875,70.451 ; U10.11@185.225,49.826 186.949,49.826 v1(186.975,49.8)
  Bottom Layer w0.3: v1(103.1,49.475) v1@103.125,49.5 ; v1(103.125,70) v1@103.174,70.049
  Bottom Layer w0.7: DC11.C4@25.9,9.9 v1(25.9,20.025) ; v1(45.275,20.025) 45.275,25.6 48.75,29.075 88.165,29.075 88.29,28.95 89.16,28.95 89.285,29.075 90.115,29.075 90.24,28.95 91.11,28.95 91.235,29.075 v1@101.35,29.075 ; v1(101.475,37.975) 101.475,47.85 v1(103.1,49.475) ; v1@103.125,49.5 v1(103.125,70) ; v1@103.174,70.049 v1(103.174,90.5) v1(103.174,131.601) ; v1@183.297,130.453 183.498,130.252 183.498,122.28 183.475,122.258 183.475,61.325 186.975,57.825 v1(186.975,49.8) 186.975,30.625 v1(185.525,29.175)
  other v1: 101.35,29 183.15,130.6
+12,6V: C35.2 C36.2 C37.2 C38.2 C39.1 C41.1 C44.1 C45.1 C46.1 DC12.A4 DC12.B4 DC12.C4 pad.6 pad.8 pad.11 Q1.2 Q3.2 Q5.2 Q7.2 Q9.2 Q11.2 Q13.2 Q15.2 Q17.2 Q19.2 Q21.2 Q23.2 Q25.2 Q27.2 Q29.2 Q31.2 R123.2 U14.7 U15.7 U19.7 U20.7 U21.7 U22.7 U23.7 U24.7 U25.7 U26.7 U27.7 U28.7 U29.7 U30.7 U31.7 U32.7 U33.7 U34.7 | length 1007.3
  Top Layer w0.6: 162.375,136.65 162.753,136.65 v1(169.3,136.65) 169.55,136.65 v1@169.6,136.7 ; v1(174.5,139.275) 186.225,139.275 v1(186.325,139.175)
  Top Layer w0.7: U15.7@18.375,53.681 18.375,54.85 18.675,55.15 v1(29.85,55.15) 29.9,55.15 v1@29.9,55.1 ; pad.6@32.137,131.588 39.995,131.588 pad.8@40.07,131.513 pad.11@48.002,131.513 ; R123.2@48.449,91.557 48.449,93.325 49.299,94.175 v1@54.275,94.175 ; v1(51.4,138.7) 69.55,138.7 ; v1(54.283,79.175) 82.7,79.175 83.778,78.097 Q13.2@83.778,76.959 ; v1(54.287,51.175) 69.425,51.175 ; C41.1@54.4,133.65 C41.1@54.372,133.65 v1(51.325,133.65) 48.4,133.65 48.05,133.3 48.05,131.561 pad.11@48.002,131.513 ; U26.7@69.325,48.706 69.325,51.075 69.425,51.175 ; U25.7@69.325,77.506 69.325,78.95 ; U24.7@69.325,106.306 69.325,108.85 54.4,108.85 v1(54.3,108.95) 54.377,109.027 54.377,117.275 C38.2@54.377,120.004 C37.2@54.377,122.733 C36.2@54.377,125.462 C35.2@54.377,128.192 54.377,128.225 48.65,128.225 48.002,128.873 pad.11@48.002,131.513 ; U23.7@69.325,135.106 69.325,138.475 69.55,138.7 ; 69.375,108.9 83.1,108.9 83.778,108.222 83.778,106.372 85.125,105.025 108.1,105.025 110.276,107.201 125.174,107.201 125.7,106.675 U20.7@125.7,106.081 ; Q9.2@83.346,135.355 83.35,135.358 Q9.2@83.35,135.761 ; Q15.2@83.778,49.084 83.778,50.597 83.2,51.175 69.425,51.175 ; Q9.2@83.778,135.334 Q9.2@83.35,135.761 ; v1(125.825,54.025) v1(134.45,54.025) 149.175,54.025 150.725,52.475 150.725,51 ; v1(132.95,111.525) 132.975,111.55 v1@150.85,111.55 ; Q7.2@139.028,48.034 140.9,46.161 DC12.A4@140.9,4.9 ; Q5.2@139.028,77.334 139.028,79.378 139.725,80.075 150.45,80.075 ; U34.7@150.45,48.206 150.725,48.481 150.725,51 ; U33.7@150.45,77.081 150.45,80.075 ; U31.7@150.45,134.631 150.45,136.1 151,136.65 162.375,136.65 ; U32.7@150.625,106.056 150.95,106.381 150.95,108.1 151.825,108.975 161.45,108.975 162.928,107.497 Q27.2@162.928,105.859 ; Q25.2@162.753,134.659 162.753,136.65 ; Q31.2@162.928,47.684 162.928,49.397 161.175,51.15 150.875,51.15 150.725,51 ; Q29.2@162.928,76.334 162.928,77.697 160.55,80.075 150.45,80.075 ; v1(203.925,58.55) v1@212.825,58.55 ; U29.7@203.925,77.331 203.925,80.25 204.95,81.275 v1(212.8,81.275) 216.45,81.275 217.403,80.322 Q21.2@217.403,78.034 ; U28.7@203.925,106.131 203.925,108.8 205.125,110 v1@212.875,110 ; 69.55,138.7 82.55,138.7 83.35,137.9 Q9.2@83.35,135.761
  Bottom Layer w0.3: 29.825,56.475 29.85,56.45 ; v1(29.85,55.15) v1@29.85,55.525 ; U22.7@125.7,48.481 U22.7@125.825,48.606 ; 132.95,55.525 132.95,55.65
  Bottom Layer w0.6: 172.95,136.65 174.5,138.2 v1(174.5,139.275) ; v1(186.325,139.175) 187.25,140.1 202.675,140.1 203.925,138.85 U27.7@203.925,134.931 U27.7@203.925,134.65
  Bottom Layer w0.7: U14.7@18.85,83.931 20.444,85.525 26,85.525 29.825,81.7 29.825,56.475 ; v1@29.85,55.525 29.85,56.45 ; 30.025,79.2 54.091,79.2 v1@54.205,79.086 ; v1(51.325,133.65) 51.4,133.725 v1(51.4,138.7) ; v1(54.2,94.225) 54.205,79.175 v1@54.205,79.086 ; v1@54.213,51.175 v1@54.205,79.086 ; v1(54.287,51.175) v1@54.287,51.338 ; v1@54.3,94.525 v1(54.3,108.95) ; U22.7@125.7,48.481 U22.7@125.706,48.481 ; U21.7@125.7,77.281 125.7,83.725 127.2,85.225 132.95,85.225 ; U20.7@125.7,106.081 125.7,106.525 126,106.225 126,110.375 127.15,111.525 v1(132.95,111.525) ; U19.7@125.7,134.881 125.7,136 126.4,136.7 132.95,136.7 v1(132.95,111.525) ; U22.7@125.825,48.606 v1(125.825,54.025) ; 132.95,55.525 v1(134.45,54.025) 137.35,54.025 139.028,52.347 Q7.2@139.028,48.034 ; 132.95,55.65 132.95,85.225 ; 132.975,136.7 138.778,136.7 ; Q3.2@139.028,106.184 139.028,110.725 138.228,111.525 v1(132.95,111.525) ; Q1.2@139.028,135.034 139.028,136.45 138.778,136.7 ; Q5.2@139.15,77.286 139,77.436 139,83 136.775,85.225 132.95,85.225 ; U32.7@150.45,105.831 150.45,105.881 U32.7@150.925,106.356 ; U31.7@150.45,134.631 150.45,136.225 149.975,136.7 138.778,136.7 ; U32.7@150.925,105.881 v1(150.925,111.45) ; v1(169.3,136.65) 172.95,136.65 ; U30.7@203.925,48.531 v1(203.925,58.55) ; 204.125,137.6 212.8,137.6 ; v1(212.875,110.025) 215.975,110.025 217.053,108.947 Q19.2@217.053,106.184 ; Q23.2@216.734,49.841 216.734,56.841 214.925,58.65 v1(212.825,58.65) 212.825,80.85 212.8,80.85 v1(212.8,81.275) 212.8,110.025 212.8,137.6 ; Q17.2@217.428,135.409 217.428,136.547 216.375,137.6 212.8,137.6 ; v1@54.205,79.086 v1@54.283,79.008 ; v1@54.283,79.008 v1(54.283,79.175) v1@54.287,51.338 ; v1@54.283,79.008 54.283,51.342 v1@54.287,51.338 ; 132.95,85.225 v1(132.95,111.525)
  other v1: 48.425,91.625 54.325,117.25 54.375,120 54.35,122.65 54.4,125.45 54.325,128.125 54.4,133.6